# Altium PCB RF-IR-Blaster-v1.1.PcbDoc (part 3 of 3)
Units mil, origin at the board's own origin, x right, y up, seen from the top; angles counter-clockwise.
Board outline 2559.06 x 2401.57 mil, 2 copper layers (Top Layer, Bottom Layer), stack 62.205 mil thick; 68 components, 37 nets, 870 pads, 147 vias.
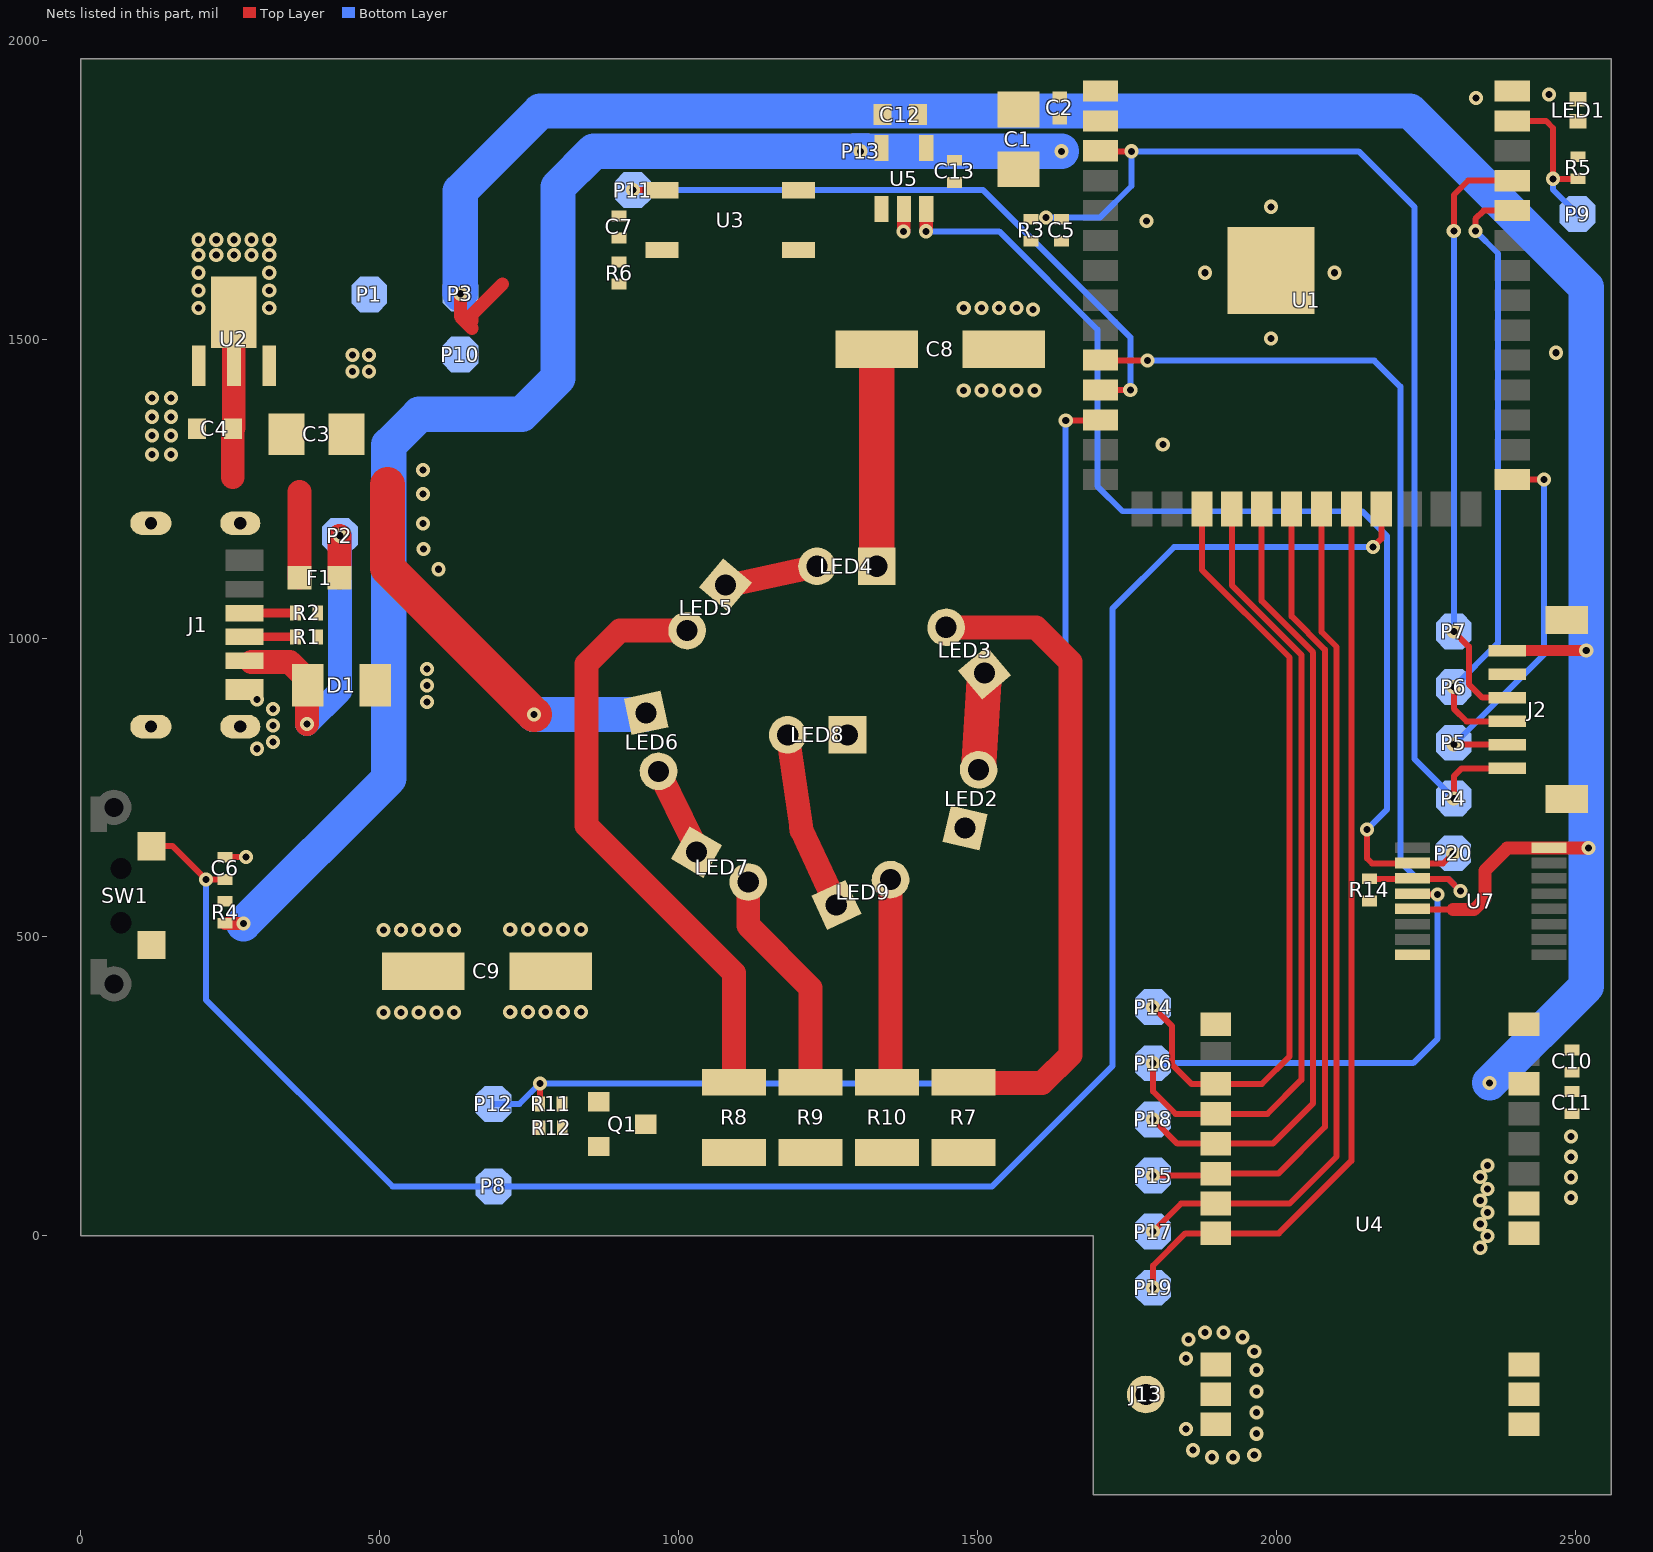
[diagram p2: the nets of this part, all layers, seen from the top]

## Via types
v1: diameter 23.62, hole 11.81, Top Layer to Bottom Layer, tented both sides, 145 vias
v2: diameter 23.62, hole 11.81, Top Layer to Bottom Layer, 2 vias

## Nets (pads, with @x,y where several pads share a name; then routed paths per layer and width w, separated by ;. In a path a pad name is that pad's centre, name@x,y a point inside that pad or via, vN(x,y) a via of type N, cw(c..) or ccw(c..) an arc to the next point about the centre after c; other vN are vias at no path point)
+3V3: C3.2 C10.2 C11.2 J2.1 P3.1 R6.2 U2.3 U4.9 U7.5 U7.16 | length 4284.1
  Top Layer w10: U7.5@2216.67,546.2 2294.8,546.2 2295,546
  Top Layer w18: J2.1@2385.63,978.92 v1(2517.53,978.94)
  Top Layer w22: v1(634.55,1575.8) 634.55,1537.45 654,1518 ; 654,1529.93 654,1540.93 705,1591.93 ; 2295,546 2330,546 2348,564 2348,611.11 2385.45,648.57 2425.33,648.57 v1@2519.99,648.57
  Bottom Layer w59.06: v1(634.55,1575.8) 634.55,1747.55 768.41,1881.41 2222.59,1881.41 2517.53,1586.47 v1(2517.53,978.94) 2517.53,417.53 v1(2356,256)
  other v1: 2521,649 454,1446 481.56,1446 454,1473.56 481.56,1473.56
+5V: C4.2 C8.1 C9.1 F1.2 LED2.1 LED4.1 LED6.1 LED8.1 P1.1 U2.2 U5.1 | length 1456.3
  Top Layer w39.37: 254,1269.06 C4.2@254,1350 ; C4.2@255.91,1351.91 U2.2@255.91,1455.41 U2.2@255.91,1544.59 ; F1.2@365.54,1100.86 365.54,1244.54
  Top Layer w40: C9.1@784.35,444 C9.1@785.43,442.91 ; C8.1@1330.71,1482.93 C8.1@1331.01,1482.63
  Top Layer w59.06: 512.83,1256.47 512.83,1117.17 v1(758,872) ; LED4.1@1331.01,1119.93 C8.1@1331.01,1482.63
  Bottom Layer w59.06: v1(758,872) 942.47,872 LED6.1@945.22,874.74
  other v1: 717.96,374.56 747.49,374.56 777.02,374.56 806.54,374.56 836.07,374.56 717.96,512.35 747.49,512.35 777.02,512.35 806.54,512.35 836.07,512.35 196.85,1551.87 314.96,1551.87 196.85,1581.4 314.96,1581.4 196.85,1610.93 314.96,1610.93 196.85,1640.45 226.38,1640.45 255.91,1640.45 285.43,1640.45 314.96,1640.45 196.85,1666.04 226.38,1666.04 255.91,1666.04 285.43,1666.04 314.96,1666.04
CC1: J1.A5 R2.2 | length 85.5
  Top Layer w15: J1.A5@273.7,1041.62 273.89,1041.81 358.81,1041.81 R2.2@359,1042
CC2: J1.B5 R1.2 | length 85.4
  Top Layer w15: J1.B5@273.7,1002.25 273.83,1002.13 358.87,1002.13 R1.2@359,1002
CS: P19.1 U1.22 U4.19 | length 1531.3
  Top Layer w10: v1(1793,-86.66) 1793,-49.66 1846.99,4.33 U4.19@1897.64,4.33 2003.33,4.33 2124.69,125.69 U1.22@2124.69,1215.65
EN: C5.2 J2.6 P4.1 R3.1 U1.3 | length 1935.3
  Top Layer w10: U1.3@1705.01,1814.86 1705.87,1814 v1(1757,1814) ; v1(2296.01,731.93) 2296.01,768.93 2309.12,782.04 J2.6@2385.6,782.04
  Bottom Layer w10: v1(1614,1703) 1704,1703 1757,1756 v1(1757,1814) 2137,1814 2230,1721 2230,797.94 v1(2296.01,731.93)
ENABLE: P20.1 U5.3 U7.2 | length 1879.8
  Top Layer w10: v1(2151,680) 2151,631.37 2159.4,622.98 2216.67,622.98 2277.98,622.98 v1(2295,640)
  Top Layer w22: v1@1413.83,1680.43 U5.3@1413.83,1717.17
  Bottom Layer w10: v1(1413.62,1680.22) 1535.71,1680.22 1700,1515.92 1700,1254 1742,1212 2143,1212 2184.65,1170.35 2184.65,713.65 v1(2151,680)
ESP_3V3: C1.2 C2.2 C12.1 P13.1 R3.2 R4.2 U1.2 U5.5 | length 2448
  Top Layer w22: R4.2@241.01,522.86 241.28,522.59 271.67,522.59 v1(271.94,522.32)
  Bottom Layer w59.06: v1(271.94,522.32) 515,765.38 515,1323 566,1374 737,1374 798,1435 798,1754.42 857.58,1814 v1(1304,1814) v1(1640,1814)
GD00: P16.1 U1.18 U4.15 U7.4 | length 2117.4
  Top Layer w10: v1(1793,288.89) 1793,242 1830.67,204.33 U4.15@1897.64,204.33 1984.35,204.33 2041.04,261.02 2041.04,971.83 1924.69,1088.18 U1.18@1924.69,1215.65 ; U7.4@2222.8,571.8 2223.19,571.4 2268.6,571.4 v1(2269,571)
  Bottom Layer w10: v1(1793,288.89) 2227.89,288.89 2269,330 v1(2269,571)
GD02: P14.1 U1.17 U4.14 | length 1314.4
  Top Layer w10: v1(1793,382.77) 1824.33,351.44 1824.33,287.05 1857.05,254.33 1975.3,254.33 2021.36,300.39 2021.36,967.48 1874.69,1114.14 U1.17@1874.69,1215.65
GND: C1.1 C2.1 C3.1 C4.1 C5.1 C6.1 C7.1 C8.2 C9.2 C10.1 C11.1 C12.2 C13.1 D1.1 J1.A12 J1.MH1 J1.MH2 J1.MH3 J1.MH4 J2.2 J2.MP1 J2.MP2 LED1.2 P10.1 Q1.2 R1.1 R2.1 R12.1 R14.1 SW1.1 U1.1 U1.40 U1.41 U2.1 U3.1 U3.2 U4.1 U4.2 U4.3 U4.4 U4.5 U4.11 U4.12 U4.20 U4.22 U5.2 U7.8 | length 72.6
  Top Layer w10: C6.1@241.01,633.36 241.33,633.68 275.68,633.68 v1(276,634)
  Top Layer w22: v1(1376,1680) 1376.22,1680.22 1376.22,1716.96 U5.2@1376.43,1717.17
  other v1: 1891.44,-370.08 1926.87,-370.08 1962.3,-366.14 1859.94,-358.27 1966.24,-330.71 1848.13,-322.83 1966.24,-295.28 1966.24,-259.84 1966.24,-224.41 1848.13,-204.72 1962.3,-192.91 1852.07,-173.23 1942.62,-169.29 1879.63,-161.42 1911.12,-161.42 2340.26,-19.69 2352.07,0 2340.26,19.69 2352.07,39.37 2340.26,59.06 2492.28,64 2352.07,78.74 2492.28,98.2 2340.26,98.43 2352.07,118.11 2492.28,132.4 2492.28,166.6 505.91,374.02 535.43,374.02 564.96,374.02 594.49,374.02 624.02,374.02 505.91,511.81 535.43,511.81 564.96,511.81 594.49,511.81 624.02,511.81 294.2,814.87 321,826 321,853.56 321,881.12 579,893 294.2,897.55 579,920.56 579,948.12 598,1115 573,1149.15 572,1191.57 572,1240.79 572,1281 119,1307 150.5,1307 1809.34,1323.52 119,1338.5 150.5,1338.5 119,1369.99 150.5,1369.99 119,1401.49 150.5,1401.49 1476.38,1414.03 1505.91,1414.03 1535.43,1414.03 1564.96,1414.03 1594.49,1414.03 2466.82,1477.06 1990.44,1500.68 1591.99,1549.33 1476.38,1551.83 1505.91,1551.83 1535.43,1551.83 1564.96,1551.83 1880.2,1610.92 2096.74,1610.92 1781.78,1697.54 1990.44,1721.16 2333,1903 2455,1909
GPIO1: P9.1 R5.2 U1.39 | length 275.6
  Top Layer w10: U1.39@2393.98,1864.86 2450.14,1864.86 2462,1853 v2@2462,1769 ; v2(2462,1768) R5.2@2504.01,1767.93 ; R5.2@2503.5,1767.43 R5.2@2504.01,1767.93
  Bottom Layer w10: v2(2462,1768) 2462,1750 P9.1@2503,1709
GPIO8: P12.1 R11.2 U1.12 | length 2138.4
  Top Layer w10: R11.2@767.5,221 v1(767.5,254.94) ; v1(1647,1364) 1704.15,1364 U1.12@1705.01,1364.86
  Bottom Layer w10: P12.1@690,221 733.56,221 v1(767.5,254.94) 1588.94,254.94 1647,313 v1(1647,1364)
GPIO11: P18.1 U1.19 U4.16 | length 1342.1
  Top Layer w10: v1(1793,195) 1833.67,154.33 U4.16@1897.64,154.33 1993.41,154.33 2060.73,221.65 2060.73,976.19 1974.69,1062.22 U1.19@1974.69,1215.65
GPIO12: P15.1 U1.20 U4.17 | length 1377.5
  Top Layer w10: v1(1793,101.11) 1894.42,101.11 U4.17@1897.64,104.33 2002.46,104.33 2080.41,182.28 2080.41,980.55 2024.69,1036.27 U1.20@2024.69,1215.65
GPIO13: P17.1 U1.21 U4.18 | length 1465.3
  Top Layer w10: v1(1793,7.23) 1840.1,54.33 2021.36,54.33 2100,132.97 2100,985 2074.69,1010.31 U1.21@2074.69,1228.66
GPIO18: P11.1 U1.11 U3.3 | length 1120.8
  Top Layer w10: v1(923,1749) v1(923,1749) U3.3@971.83,1748.93 U3.3@971.83,1748.93 ; U1.11@1705.01,1414.86 1705.15,1415 v1(1755,1415)
  Bottom Layer w10: v1(923,1749) 1509,1749 1755,1503 v1(1755,1415)
GPIO21: C6.2 P8.1 R4.1 SW1.2 U1.23 | length 3388.6
  Top Layer w10: SW1.2@118.19,651.88 153.48,651.88 v1(209,596.36) C6.2@241.01,596.36 ; v1(2160.84,1152) 2174.72,1165.89 U1.23@2174.69,1215.65
  Bottom Layer w10: v1(209,596.36) 209,395 521,83 P8.1@690,83 1524,83 1725,284 1725,1049 1828,1152 v1(2160.84,1152)
IO0: J2.5 P5.1 U1.27 | length 647.8
  Top Layer w10: v1(2296.01,821.93) J2.5@2385.08,821.93 ; U1.27@2393.98,1264.86 2394.13,1265 v1(2447,1265)
  Bottom Layer w10: v1(2296.01,821.93) 2447,972.92 v1(2447,1265)
NetC7_2: C7.2 R6.1 U3.4
NetC13_2: C13.2 U5.4
NetJ13_1: J13.1 U4.21
NetLED1_1: LED1.1 R5.1
NetLED2_2: LED2.2 LED3.1 | length 178.2
  Top Layer w40: LED3.1@1509.87,925.13 LED3.1@1511.29,941.32
  Top Layer w59.06: LED2.2@1501.26,779.65 LED3.1@1511.29,941.32
NetLED3_2: LED3.2 R7.1 | length 1087.3
  Top Layer w40: LED3.2@1447.01,1017.93 1597.07,1017.93 1655,960 1655,303 1607.51,255.51 R7.1@1476.38,255.51
NetLED4_2: LED4.2 LED5.1 | length 156.2
  Top Layer w40: LED5.1@1078.01,1088.93 1094.2,1090.35 LED4.2@1231.01,1119.93
NetLED5_2: LED5.2 R8.1 | length 993.1
  Top Layer w40: LED5.2@1013.73,1012.32 901.32,1012.32 845.57,956.57 845.57,686.43 1092.52,439.48 R8.1@1092.52,257
NetLED6_2: LED6.2 LED7.1 | length 149.4
  Top Layer w40: LED6.2@966.01,776.93 1025.2,657.63 LED7.1@1029.41,641.93
NetLED7_2: LED7.2 R9.1 | length 378.2
  Top Layer w40: LED7.2@1116.01,591.93 1116.01,518.99 1220.47,414.53 R9.1@1220.47,257
NetLED8_2: LED8.2 LED9.1 | length 298.8
  Top Layer w40: LED8.2@1182,838 1204.5,683.97 1205.35,678.17 1258.51,564.16 LED9.1@1263.37,553.74
NetLED9_2: LED9.2 R10.1 | length 343.1
  Top Layer w40: R10.1@1348.43,257 1351.56,257 1354,259.44 LED9.2@1354,596
NetQ1_1: Q1.1 R11.1 R12.2
NetQ1_3: Q1.3 R7.2 R8.2 R9.2 R10.2
RESET: R14.2 U1.10 U7.3 | length 1596.5
  Top Layer w10: U1.10@1705.01,1464.86 1705.87,1464 v1(1784,1464) ; R14.2@2155,598 R14.2@2155,597.39 2216.67,597.39 2216.86,597.19 2286.81,597.19 v1(2307,577)
  Bottom Layer w10: v1(1784,1464) 2163,1464 2206.6,1420.4 2206.6,625.4 2234.81,597.19 2286.81,597.19 v1(2307,577)
RXD: J2.4 P6.1 U1.36 | length 1031.5
  Top Layer w10: v1(2296.01,917.93) 2296.01,881.99 2317.22,860.78 J2.4@2385.6,860.78 ; v1(2332,1681) 2332,1701 2345.86,1714.86 U1.36@2393.98,1714.86
  Bottom Layer w10: v1(2296.01,917.93) 2370,991.92 2370,1643 v1(2332,1681)
TXD: J2.3 P7.1 U1.37 | length 1011.5
  Top Layer w10: v1(2296.01,1010.93) 2321.23,985.7 2321.23,922.77 2343.85,900.15 J2.3@2385.6,900.15 ; v2@2296,1680 v2(2296,1681) 2296,1741 2319.86,1764.86 ; 2320,1765 2319.86,1764.86 ; U1.37@2393.98,1764.86 2319.86,1764.86
  Bottom Layer w10: v1(2296.01,1010.93) v2(2296,1681)
VBUS: D1.2 F1.1 J1.A9 P2.1 | length 588.6
  Top Layer w40: J1.A9@285.2,960.09 349.3,960.09 379.41,929.98 D1.2@379.41,920.93 378,919.52 v1(378,856) ; F1.1@432.47,1100.86 v1@432.47,1170.47
  Bottom Layer w40: v1(378,856) 433,911 v1(433,1171)
pads on no net: J1.B9 J1.B12 SW1.3 SW1.4 SW1.5 SW1.6 SW1.MH0 SW1.MH1 U1.4 U1.5 U1.6 U1.7 U1.8 U1.9 U1.13 U1.14 U1.15 U1.16 U1.24 U1.25 U1.26 U1.28 U1.29 U1.30 U1.31 U1.32 U1.33 U1.34 U1.35 U1.38 U4.6 U4.7 U4.8 U4.10 U4.13 U7.1 U7.6 U7.7 U7.9 U7.10 U7.11 U7.12 U7.13 U7.14 U7.15

## Polygon pours and split planes (outlines as drawn)
GND on Top Layer "GND_L01_P012" (solid, remove dead copper, pour order 12): 50,50 1740,50 1742.91,50 1742.91,-383.07 1743,-383.07 2509.05,-383.07 2509.05,1918.5 50,1918.5 50,1917
+5V on Top Layer "F.Cu-+5V-1" (solid, remove dead copper, pour order 10): 714.57,590.55 ccw(c714.57,570.87) 694.88,570.87 694.88,364.17 ccw(c714.57,364.17) 714.57,344.49 881.89,344.49 ccw(c881.89,364.17) 901.57,364.17 901.57,570.87 ccw(c881.89,570.87) 881.89,590.55
+5V on Top Layer "F.Cu-+5V" (solid, remove dead copper, pour order 3): 281.5,1370.77 cw(c261.81,1370.77) 261.81,1351.08 250,1351.08 cw(c250,1370.77) 230.31,1370.77 230.31,1469.19 ccw(c210.63,1469.19) 210.63,1488.88 33.46,1488.88 cw(c33.46,1508.56) 13.78,1508.56 13.78,1952.86 526.95,1952.86 525.65,1508.51 cw(c505.97,1508.56) 505.96,1488.88 301.18,1488.88 ccw(c301.18,1469.19) 281.5,1469.19
GND on Bottom Layer "GND_L02_P011" (solid, remove dead copper, pour order 11): 50,50 1740,50 1742.91,50 1742.91,-383.07 1743,-383.07 2509.05,-383.07 2509.05,1918.5 50,1918.5 50,1917
+5V on Bottom Layer "B.Cu-+5V-2" (solid, remove dead copper, pour order 2): 525.59,1508.56 cw(c505.91,1508.56) 505.91,1488.88 33.46,1488.88 cw(c33.46,1508.56) 13.78,1508.56 13.78,1954.72 525.59,1951
+5V on Bottom Layer "B.Cu-+5V-3" (solid, remove dead copper, pour order 9): 704.72,354.49 1038,354.49 1038,646.69 704.72,646.28
+5V on Bottom Layer "B.Cu-+5V-1" (solid, remove dead copper, pour order 7): 1401.7,1203.09 cw(c1401.7,1183.4) 1415.62,1197.32 1600.94,1012 cw(c1587.02,998.08) 1606.7,998.08 1606.7,669.9 cw(c1587.02,669.9) 1600.94,655.98 1415.62,470.66 cw(c1401.7,484.58) 1401.7,464.9 1043.99,464.9 cw(c1043.99,484.58) 1030.07,470.66 864.44,636.3 cw(c878.36,650.22) 858.67,650.22 858.67,988.24 cw(c878.36,988.24) 864.44,1002.16 1059.6,1197.32 cw(c1073.52,1183.4) 1073.52,1203.09

## Other copper
Top Layer:
  rectangle net +3V3: 702,1575 918,1604
  rectangle net +5V: 1291,1451 1351,1743
  rectangle net NetC13_2: 1399,1788 1478,1845
  rectangle net ESP_3V3: 1291,1795 1358,1897
  rectangle net +3V3: 592,1432 716,1604
  rectangle net ESP_3V3: 1619,1847.12 1741.23,1883
  rectangle net ESP_3V3: 1619,1750 1664,1880
  rectangle net ESP_3V3: 1529,1750 1664,1827
  rectangle net +5V: 234.31,1227 542,1286
  rectangle net GND: 2348,1892 2519,1932
  rectangle net GND: 1384,1854 1604,1931
  rectangle net GND: 1523,1897 1733,1931
  rectangle net NetLED1_1: 2486,1796 2522,1877
  rectangle net +3V3: 305,1432 716,1491
  rectangle net ESP_3V3: 1529,1648 1564,1827
  rectangle net ESP_3V3: 1529,1648 1603.44,1676.55
  rectangle net EN: 1576,1689 1656.01,1716
  rectangle net +3V3: 2334,233.93 2478.01,276
  rectangle net +3V3: 2463,227 2510.01,284
  rectangle net NetC7_2: 878,1619 1002,1679
  rectangle net +3V3: 305,1303 374,1491
  rectangle net GPIO21: 225,549 256,607
  rectangle net NetQ1_1: 793,163 820,241
  rectangle net NetQ1_1: 793,205 885,241
  rectangle net NetQ1_3: 926,109 964,206
  rectangle net NetQ1_3: 929,109 1533.56,163.41
  rectangle net VBUS: 233,940 319,980
  region net NetJ13_1: 1753.51,-246.52 ccw(c1783.58,-263.3) 1755.12,-282.68 ccw(c1779.3,-271.29) 1780.58,-297.99 1813.05,-297.99 ccw(c1813.06,-257.06) 1842,-286 cw(c1844.97,-288.97) 1844.98,-284.77 1921.15,-284.77 ccw(c1921.15,-282.15) 1923,-284 1923,-245 1854.71,-245 cw(c1854.71,-218.98) 1836.31,-237.38 ccw(c1820.5,-253.18) 1820.49,-230.83 1776.79,-230.83 ccw(c1776.78,-249.12) 1763.84,-236.19
Bottom Layer:
  rectangle net +3V3: 421,1430.65 506.85,1489.53

## Silkscreen, mask and mechanical layers (free items; w line width, h text height)
Top Overlay:
  drawing of 4 lines, arcs and shapes, not listed
  text "IR+RF Blaster" at 12,122 h78.74
  text "revA" at 12,66 h78.74
Bottom Overlay:
  text "ESP_3V3" at 1266,1793.31 h39.37
  text "GPIO18" at 883.97,1730.31 h39.37
  text "GPIO1" at 2464.09,1689.31 h39.37
  text "3V3" at 754,1556.31 h39.37
  text "5V" at 442.53,1554.82 h39.37
  text "GND" at 752.38,1454.31 h39.37
  text "VBUS" at 572.04,1151.31 h39.37
  text "TXD" at 2258.57,991.34 h39.37
  text "RXD" at 2258.62,898.34 h39.37
  text "IO0" at 2256.3,805.31 h39.37
  text "EN" at 2256.63,712.42 h39.37
  text "ENABLE" at 2256.21,620.31 h39.37
  text "GD02" at 1962.63,363.19 h39.37
  text "GD00" at 1962.63,269.3 h39.37
  text "GPIO8" at 651.27,202.31 h39.37
  text "GPIO11" at 1962.63,175.42 h39.37
  text "GPIO12" at 1962.71,80.53 h39.37
  text "GPIO21" at 649.88,64.31 h39.37
  text "GPIO13" at 1962.84,-13.35 h39.37
  text "CS" at 1962,-106.69 h39.37
Dimension:
  drawing of 11071 lines, arcs and shapes, not listed
Board_Outline:
  the board outline again, w10
Fabrication:
  drawing of 191 lines, arcs and shapes, not listed
  text "Layer" at 2983.74,360 h60
  text "Name" at 3393.65,360 h60
  text "Material" at 4323.4,360 h60
  text "Thickness" at 5183.16,360 h60
  text "Constant" at 5833,360 h60
  text "Board Layer Stack" at 6402.86,360 h60
  text "Top Overlay" at 3393.65,240 h60
  text "Top Solder" at 3393.65,120 h60
  text "Solder Resist" at 4323.4,120 h60
  text "0.39mil" at 5183.16,120 h60
  text "3.3" at 5833,120 h60
  text "1" at 2983.74,0 h60
  text "Top Layer" at 3393.65,0 h60
  text "1.38mil" at 5183.16,0 h60
  text "Dielectric 1" at 3393.65,-120 h60
  text "FR-4" at 4323.4,-120 h60
  text "59.45mil" at 5183.16,-120 h60
  text "4.5" at 5833,-120 h60
  text "2" at 2983.74,-240 h60
  text "Bottom Layer" at 3393.65,-240 h60
  text "1.38mil" at 5183.16,-240 h60
  text "Bottom Solder" at 3393.65,-360 h60
  text "Solder Resist" at 4323.4,-360 h60
  text "0.39mil" at 5183.16,-360 h60
  text "3.3" at 5833,-360 h60
  text "Bottom Overlay" at 3393.65,-480 h60
  text "Total board thickness:" at 2983.74,-600 h60
  text "62.99mil" at 5183.16,-600 h60
Mechanical 4:
  drawing of 1326 lines, arcs and shapes, not listed
Drill Drawing:
  circle w10: c3018.5,1189.33 r33.33
  lines w10: 2985.16,1306 2985.16,1322.67 3001.83,1339.33 2985.16,1356 2985.16,1372.67 3001.83,1372.67 3018.5,1356 3035.16,1372.67 3051.83,1372.67 3051.83,1356 3035.16,1339.33 3051.83,1322.67 3051.83,1306 3035.16,1306 3018.5,1322.67 3001.83,1306 2985.16,1306 ; 2985.16,1522.67 3051.83,1522.67 3018.5,1456 2985.16,1522.67 ; 2985.16,1622.67 3001.83,1622.67 3018.5,1606 3035.16,1622.67 3051.83,1622.67 3035.16,1639.33 3051.83,1656 3035.16,1656 3018.5,1672.67 3001.83,1656 2985.16,1656 3001.83,1639.33 2985.16,1622.67 ; 2985.16,1756 3051.83,1756 3051.83,1822.67 2985.16,1822.67 2985.16,1756 ; 2985.16,1906 3018.5,1922.67 3051.83,1906 3035.16,1939.33 3051.83,1972.67 3018.5,1956 2985.16,1972.67 3001.83,1939.33 2985.16,1906
  lines w15: 2925.37,1111 12382.76,1111 ; 2925.37,2011 12382.76,2011 ; 3476.25,961 3476.25,2161 ; 4066.09,961 4066.09,2161 ; 5165.77,961 5165.77,2161 ; 5671.65,961 5671.65,2161 ; 6405.45,961 6405.45,2161 ; 7905,961 7905,2161 ; 8494.85,961 8494.85,2161 ; 9240.65,961 9240.65,2161 ; 9890.48,961 9890.48,2161 ; 10980.16,961 10980.16,2161 ; 2925.37,961 12382.76,961 12382.76,2161 2925.37,2161 2925.37,961
  text "Symbol" at 3015.37,2056 h72
  text "Count" at 3521.25,2056 h72
  text "Hole Size" at 4111.09,2056 h72
  text "Plated" at 5210.77,2056 h72
  text "Hole Type" at 5716.65,2056 h72
  text "Drill Layer Pair" at 6450.45,2056 h72
  text "Via/Pad" at 7950,2056 h72
  text "Pad Shape" at 8539.85,2056 h72
  text "Template" at 9285.65,2056 h72
  text "Hole Length" at 9935.48,2056 h72
  text "Routed Path Length" at 11025.16,2056 h72
  text "147" at 3521.25,1906 h60
  text "11.81mil (0.300mm)" at 4111.09,1906 h60
  text "PTH" at 5210.77,1906 h60
  text "Round" at 5716.65,1906 h60
  text "Top Layer - Bottom Layer" at 6450.45,1906 h60
  text "Via" at 7950,1906 h60
  text "Rounded" at 8539.85,1906 h60
  text "(Mixed)" at 9285.65,1906 h60
  text "-" at 9935.48,1906 h60
  text "-" at 11025.16,1906 h60
  text "4" at 3521.25,1756 h60
  text "20.47mil (0.520mm)" at 4111.09,1756 h60
  text "PTH" at 5210.77,1756 h60
  text "Slot" at 5716.65,1756 h60
  text "Top Layer - Bottom Layer" at 6450.45,1756 h60
  text "Pad" at 7950,1756 h60
  text "Rounded" at 8539.85,1756 h60
  text "(Mixed)" at 9285.65,1756 h60
  text "47.24mil (1.200mm)" at 9935.48,1756 h60
  text "26.77mil (0.680mm)" at 11025.16,1756 h60
  text "2" at 3521.25,1606 h60
  text "31.50mil (0.800mm)" at 4111.09,1606 h60
  text "PTH" at 5210.77,1606 h60
  text "Round" at 5716.65,1606 h60
  text "Top Layer - Bottom Layer" at 6450.45,1606 h60
  text "Pad" at 7950,1606 h60
  text "Rounded" at 8539.85,1606 h60
  text "c150h80" at 9285.65,1606 h60
  text "-" at 9935.48,1606 h60
  text "-" at 11025.16,1606 h60
  text "2" at 3521.25,1456 h60
  text "35.43mil (0.900mm)" at 4111.09,1456 h60
  text "NPTH" at 5210.77,1456 h60
  text "Round" at 5716.65,1456 h60
  text "Top Layer - Bottom Layer" at 6450.45,1456 h60
  text "Pad" at 7950,1456 h60
  text "Rounded" at 8539.85,1456 h60
  text "c0hn90" at 9285.65,1456 h60
  text "-" at 9935.48,1456 h60
  text "-" at 11025.16,1456 h60
  text "1" at 3521.25,1306 h60
  text "35.43mil (0.900mm)" at 4111.09,1306 h60
  text "PTH" at 5210.77,1306 h60
  text "Round" at 5716.65,1306 h60
  text "Top Layer - Bottom Layer" at 6450.45,1306 h60
  text "Pad" at 7950,1306 h60
  text "Rounded" at 8539.85,1306 h60
  text "c160h90" at 9285.65,1306 h60
  text "-" at 9935.48,1306 h60
  text "-" at 11025.16,1306 h60
  text "16" at 3521.25,1156 h60
  text "35.43mil (0.900mm)" at 4111.09,1156 h60
  text "PTH" at 5210.77,1156 h60
  text "Round" at 5716.65,1156 h60
  text "Top Layer - Bottom Layer" at 6450.45,1156 h60
  text "Pad" at 7950,1156 h60
  text "(Mixed)" at 8539.85,1156 h60
  text "(Mixed)" at 9285.65,1156 h60
  text "-" at 9935.48,1156 h60
  text "-" at 11025.16,1156 h60
  text "172 Total" at 3521.25,1006 h60
  text "Slot definitions :" at 3015.37,861.03 h60
  text "Routed Path Length" at 4048.06,861.03 h60
  text "= Calculated from tool start centre position to tool end centre position." at 5150.73,861.03 h60
  text "Hole Length" at 4048.06,761.05 h60
  text "= Routed Path Length + Tool Size = Slot length as defined in the PCB layout" at 4740.86,761.05 h60

## Dimensions
0,0 to 2559.06,-433.07 on Dimension
1692.91,0 to 0,0 on Dimension
2559.06,1968.5 to 2559.06,-433.07 on Dimension

## Text inside footprints (layer, text, board x,y; h text height)
J1: Top Overlay "Board Edge" at 68.36,1122.94 h19.68 r270